# Altium PCB IDC_Tester_v1.PcbDoc (part 2 of 5)
Units mm, origin at the board's own origin, x right, y up, seen from the top; angles counter-clockwise.
Board outline 140 x 140 mm, 2 copper layers (Top Layer, Bottom Layer); 594 components, 528 nets, 1855 pads, 179 vias.
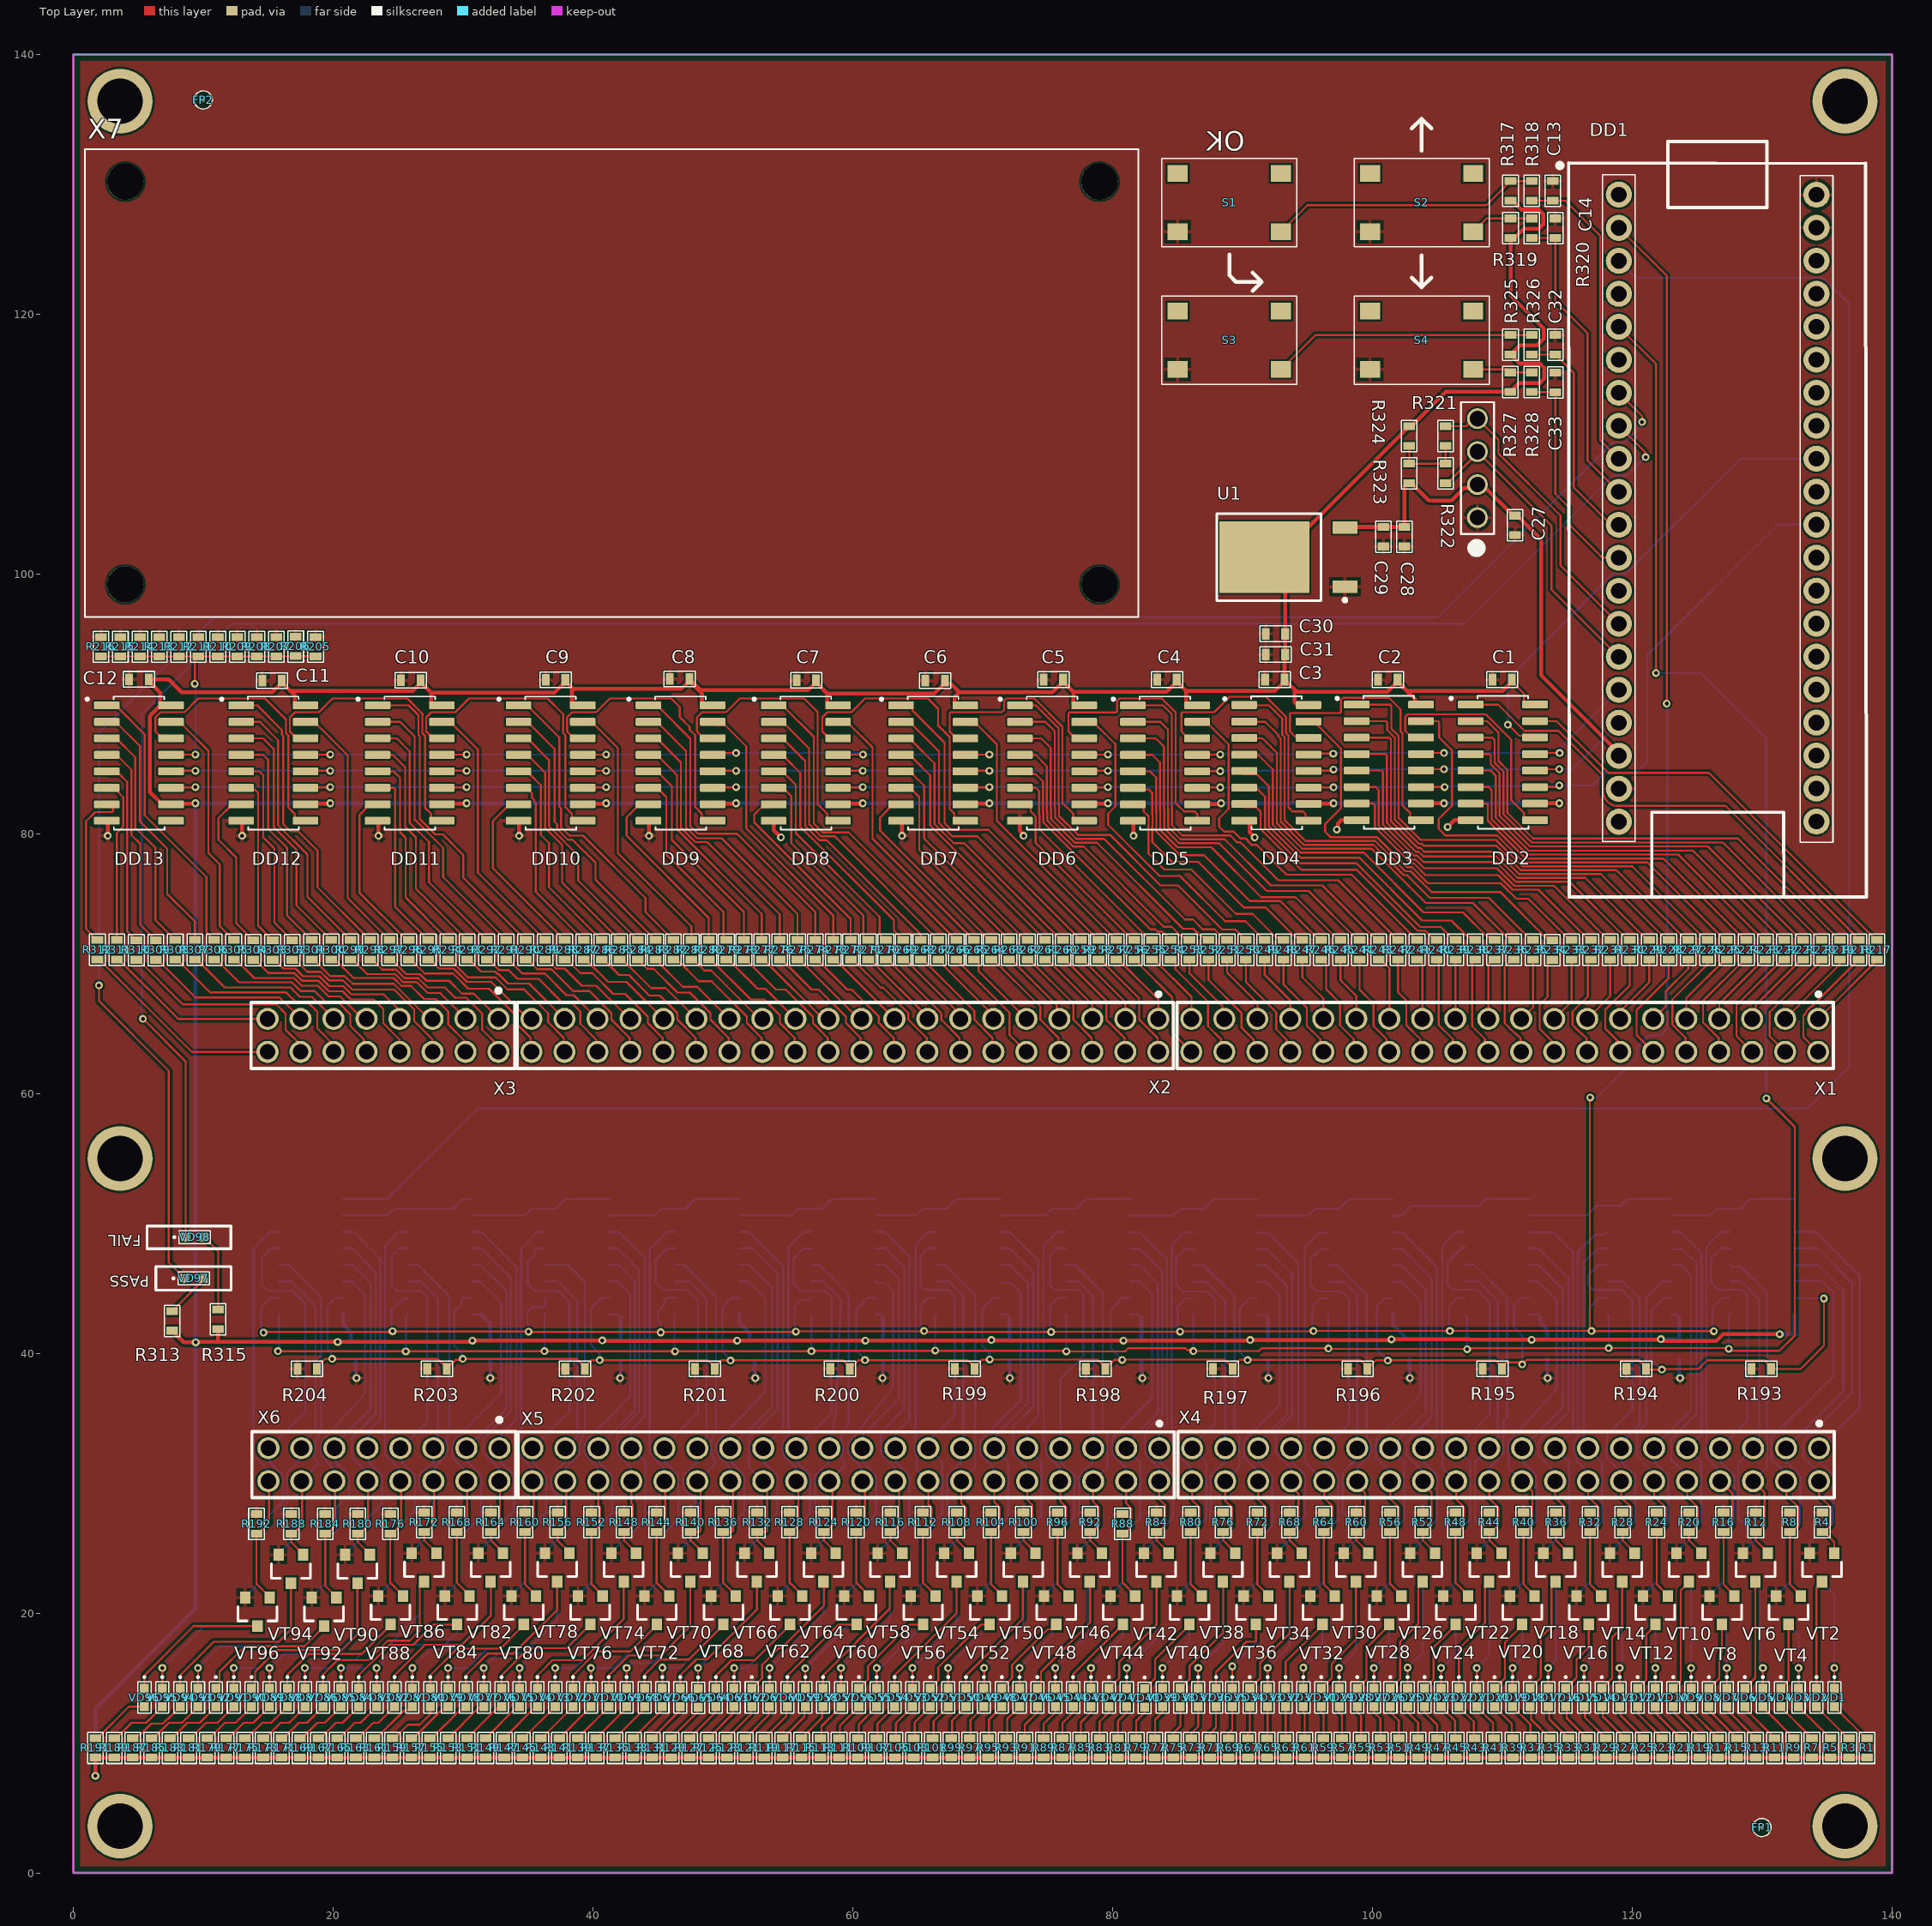
[diagram p0: Top Layer view]

## Part data (continued)
VD97: library part LED, "LED Uni-Color Green 515nm 2-Pin SMD T/R", Case Code (Imperial)=0603, Case Code (Metric)=1608, Color=Green, Forward Voltage=3.3V, Manufacturer=Kingbright, Manufacturer Part Number=APG1608ZGCK, Supplier Part Number 1=754-2113-1-ND, Test Current=20mA, Added by=viskov2055@gmail.com, Case/Package=0603, Category=LEDs, ComponentLink1Description=https://datasheet.octopart.com/APG1608ZGCK-Kingbright-datasheet-153682089.pdf?src-supplier=Future+Electronics, ComponentLink1URL=https://datasheet.octopart.com/APG1608ZGCK-Kingbright-datasheet-153682089.pdf?src-supplier=Future+Electronics, ComponentLink2Description=http://www.kingbrightusa.com/images/catalog/SPEC/APG1608ZGCK.pdf?src-supplier=Digikey, ComponentLink2URL=http://www.kingbrightusa.com/images/catalog/SPEC/APG1608ZGCK.pdf?src-supplier=Digikey, ComponentLink3Description=https://datasheet.octopart.com/APG1608ZGCK-Kingbright-datasheet-137408059.pdf?src-supplier=Sager+Electronics, ComponentLink3URL=https://datasheet.octopart.com/APG1608ZGCK-Kingbright-datasheet-137408059.pdf?src-supplier=Sager+Electronics, Created at=13/02/2024, Dominant Wavelength=525nm, Height=0.28mm, Length=1.6mm, Lens Size=0.8mm, Lens Style=Flat, Lens Transparency=Clear, Luminous Intensity=400mcd, Mount=MOUNT, MountType=SMD, Packaging="Tape and Reel", Part Number=APG1608ZGCK, Pkg=0603, Pricing 1="1=0,6, 10=0,368, 100=0,2114, 1000=0,16544, 2000=0,15165 (USD)", RoHS=Yes, RoHS Compliant=Yes, Solder_Amount=2, Stock 1=44996, Supplier 1=Digikey, Viewing Angle=130°, Width=0.8mm
VD98: Part Number=APT1608SURCK, Added by=viskov2055@gmail.com, Created at=13/02/2024, Mount=MOUNT, Mount_Type=SMD, Pkg=0603, Solder_Amount=2
VT1 VT2 VT3 VT4 VT5 VT6 VT7 VT8 VT9 VT10 VT11 VT12 VT13 VT14 VT15 VT16 VT17 VT18 VT19 VT20 VT21 VT22 VT23 VT24 VT25 VT26 VT27 VT28 VT29 VT30 VT31 VT32 VT33 VT34 VT35 VT36 VT37 VT38 VT39 VT40 VT41 VT42 VT43 VT44 VT45 VT46 VT47 VT48 VT49 VT50 VT51 VT52 VT53 VT54 VT55 VT56 VT57 VT58 VT59 VT60 VT61 VT62 VT63 VT64 VT65 VT66 VT67 VT68 VT69 VT70 VT71 VT72 VT73 VT74 VT75 VT76 VT77 VT78 VT79 VT80 VT81 VT82 VT83 VT84 VT85 VT86 VT87 VT88 VT89 VT90 VT91 VT92 VT93 VT94 VT95 VT96: "N-Channel Logic Level Enhancement Mode Field Effect Transistor", Added_by=ma_lubushkin@teslatec.ru, Created_at=03/12/2019, Mount=MOUNT, MountType=SMD, Part Number=BSS138, Pkg=SOT-23, Solder_Amount=3
X1 X2 X4 X5: Part Number=DS1021-2x20, Added by=viskov2055@gmail.com, Mount=MOUNT, Mount_Type=THM, Pkg=PLD-40, Solder_Amount=40
  X1 X2: Created at=13/02/2024
  X4 X5: Created at=16/02/2024
X3 X6: Part Number=DS1021-2x8, Added by=viskov2055@gmail.com, Mount=MOUNT, Mount_Type=THM, Pkg=PLD-16, Solder_Amount=16
  X3: Created at=13/02/2024
  X6: Created at=16/02/2024
X7: Part Number="LCD1602I2C (green light)", Added by=viskov2055@gmail.com, Created at=19/02/2024, Mount=MOUNT, Mount_Type=THM, Pkg="board (connector)", Solder_Amount=4

## Free pads (board coordinates)
  round 5 hole 3.5: 1(3.6,3.6) 2(3.6,136.4) 3(136.4,136.4) 4(3.6,55) 4(136.4,3.6) 5(136.4,55)

## Via types
v1: diameter 0.6, hole 0.3, Top Layer to Bottom Layer, 179 vias